# Altium PCB NB3000XN.PcbDoc (part 18 of 71)
Units mil, origin at the board's own origin, x right, y up, seen from the top; angles counter-clockwise.
Board outline 9527.56 x 6929.77 mil, 6 copper layers (Top Layer, GND+SHIELD, MidLayer1, MidLayer2, P2 - 3V3+5V0, Bottom Layer), stack 62.375 mil thick; 832 components, 1027 nets, 4655 pads, 4981 vias.
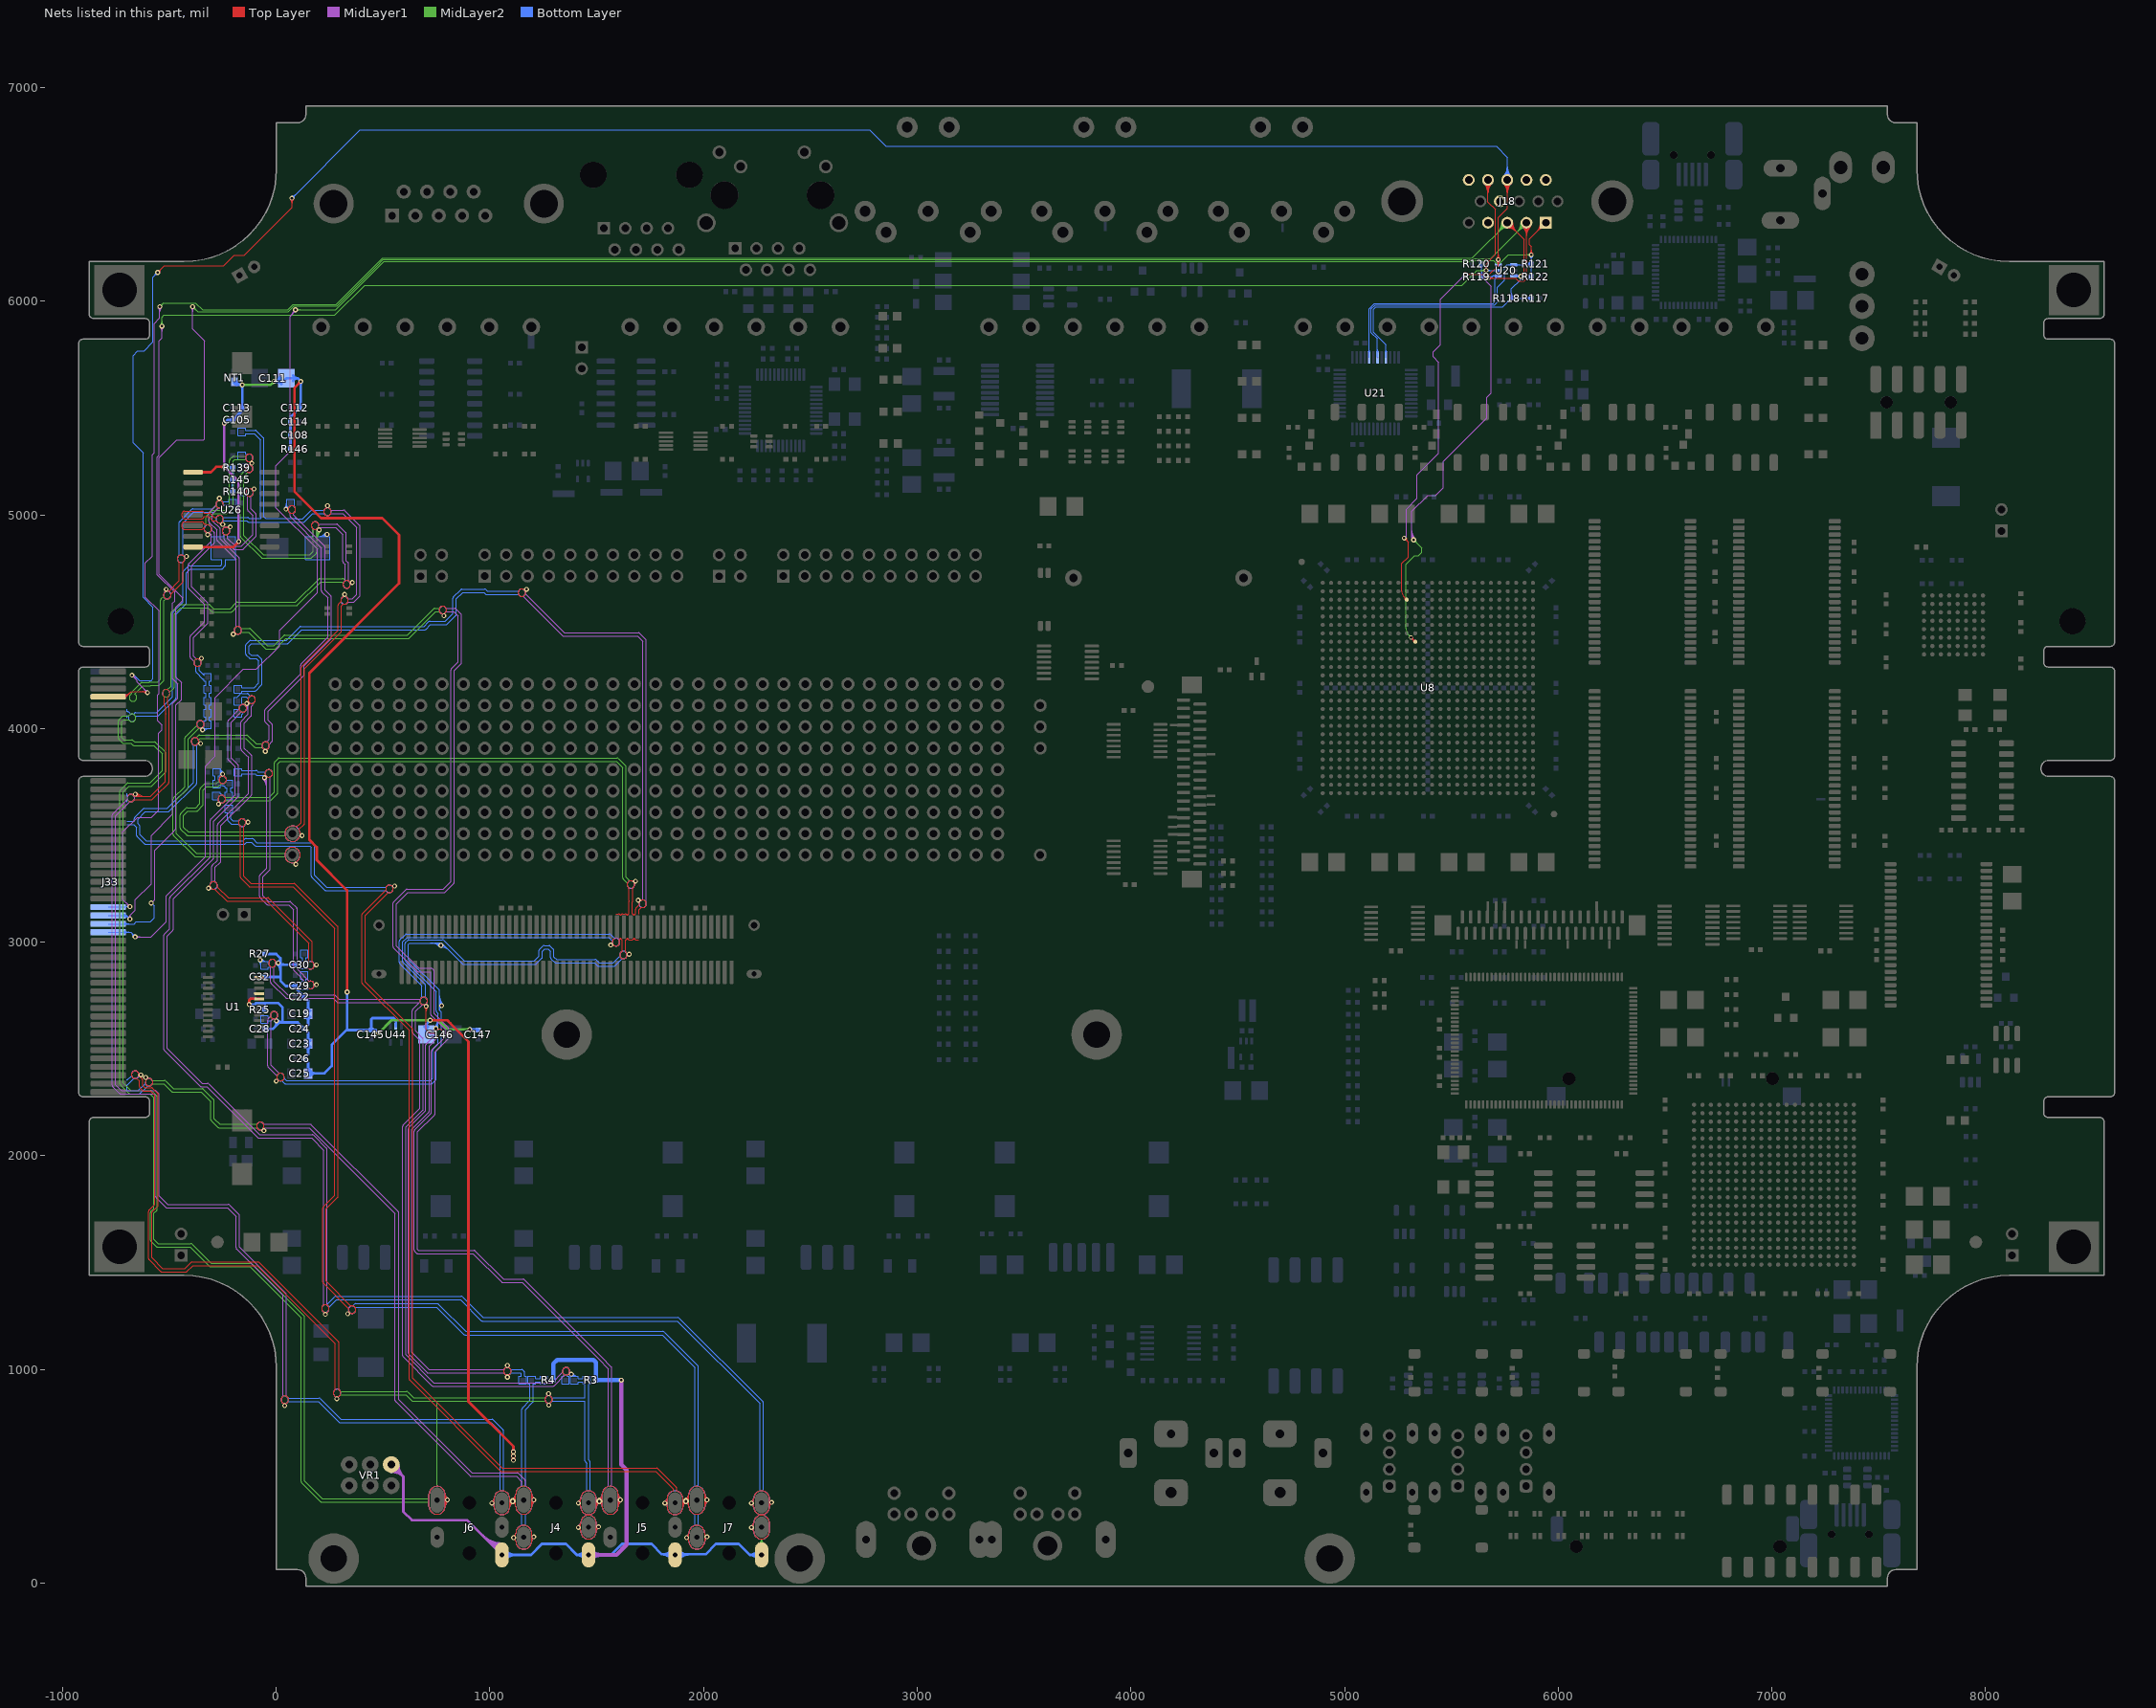
[diagram p22: the nets of this part, all layers, seen from the top]

## Via types
v1: diameter 23, hole 11.81, Top Layer to Bottom Layer, 3672 vias
v2: diameter 26, hole 11.81, Top Layer to Bottom Layer, 461 vias
v3: diameter 19, hole 11.81, Top Layer to Bottom Layer, tented both sides, 396 vias
v4: diameter 23.62, hole 11.81, Top Layer to Bottom Layer, 288 vias
v5: diameter 20, hole 11.81, Top Layer to Bottom Layer, 91 vias
v6: diameter 23, hole 11.81, Top Layer to Bottom Layer, tented both sides, 50 vias
v7: diameter 31, hole 11.81, Top Layer to Bottom Layer, 15 vias
v8: diameter 27.56, hole 11.81, Top Layer to Bottom Layer, tented both sides, 4 vias
v9: diameter 29, hole 11.81, Top Layer to Bottom Layer, 3 vias
v10: diameter 21, hole 11.81, Top Layer to Bottom Layer, 1 vias

## Nets (pads, with @x,y where several pads share a name; then routed paths per layer and width w, separated by ;. In a path a pad name is that pad's centre, name@x,y a point inside that pad or via, vN(x,y) a via of type N, cw(c..) or ccw(c..) an arc to the next point about the centre after c; other vN are vias at no path point) (continued)
ATE.VGA#.BLUE: J18.3 J33.B27 R117.1 R118.2 U20.3 U21.45 | length 12154.1
  Top Layer w4: J18.3@5761.68,6342.44 cw(c5761.68,6280.74) 5805.32,6324.37 cw(c5848.95,6368) J18.3@5787.24,6368 ; J18.3@5761.68,6346.44 cw(c5761.68,6294.39) 5798.49,6331.2 cw(c5835.29,6368) J18.3@5783.24,6368 ; J18.3@5761.68,6350.44 cw(c5761.68,6308.05) 5791.66,6338.02 cw(c5821.64,6368) J18.3@5779.24,6368 ; J18.3@5761.68,6354.44 cw(c5761.68,6321.71) 5784.83,6344.85 cw(c5807.98,6368) J18.3@5775.24,6368 ; J18.3@5761.68,6368 5840,6289.68 5840,6132.18 v1(5824.52,6116.71)
  MidLayer1 w4: v1@-694.31,3166.71 ccw(c-717.24,3166.71) -701.03,3182.93 ccw(c-684.81,3199.14) v1@-684.81,3176.21 ; v1@-690.31,3166.71 ccw(c-703.59,3166.71) -694.2,3176.1 ccw(c-684.81,3185.49) v1@-684.81,3172.21 ; v1(-684.81,3166.71) -718.14,3200.04 -718.14,3516.86 -650,3585 -583.94,3585 -551.48,3617.47 -551.48,3977.46 -534.5,3994.44 -534.5,4015.56 -555,4036.06 -555,4158.5 -549.19,4164.31 -549.19,4551.38 -612.81,4615 -612.81,4775 -580.14,4807.67 -580.14,5281.43 -571.52,5290.05 -571.52,5896.3 -545,5922.82 v4(-545,5975) ; v4@-551.94,5968.06 cw(c-568.69,5951.31) -545,5951.31 cw(c-521.31,5951.31) v4@-538.06,5968.06 ; v4@-549.11,5970.89 cw(c-559.03,5960.97) -545,5960.97 cw(c-530.97,5960.97) v4@-540.89,5970.89
  MidLayer2 w4: v4(-545,5975) -527.46,5992.54 -377.54,5992.54 -344.34,5959.34 53.28,5959.34 79.44,5985.5 280.5,5985.5 497.54,6202.54 5597.54,6202.54 5612.19,6217.19 5761.68,6366.68 J18.3@5761.68,6368 ; v4@-545,5980.81 ccw(c-545,5994.84) -535.08,5984.92 ccw(c-525.16,5975) v4@-539.19,5975 ; v4@-545,5984.81 ccw(c-545,6008.5) -528.25,5991.75 ccw(c-511.5,5975) v4@-535.19,5975 ; 5717.12,6322.12 ccw(c5671.25,6368) J18.3@5736.13,6368 ; 5720.3,6325.3 cw(c5761.68,6283.91) J18.3@5761.68,6342.44 ; 5723.95,6328.95 ccw(c5684.9,6368) J18.3@5740.13,6368 ; 5727.13,6332.13 cw(c5761.68,6297.57) J18.3@5761.68,6346.44 ; 5730.78,6335.78 ccw(c5698.56,6368) J18.3@5744.13,6368 ; 5733.95,6338.95 cw(c5761.68,6311.22) J18.3@5761.68,6350.44 ; 5737.61,6342.61 ccw(c5712.22,6368) J18.3@5748.13,6368 ; 5740.78,6345.78 cw(c5761.68,6324.88) J18.3@5761.68,6354.44
  Bottom Layer w4: J33.B27@-785.98,3164.67 -702.85,3164.67 -700.81,3166.71 ; v1@-693.15,3162.16 ccw(c-700.81,3157.98) -700.81,3166.71 ; v1@-693.15,3171.26 cw(c-700.81,3175.43) -700.81,3166.71 ; v1(-684.81,3166.71) -700.81,3166.71 ; U21.45@5191.38,5763.68 ccw(c5184.56,5770.51) 5194.21,5770.51 ccw(c5203.87,5770.51) U21.45@5197.04,5763.68 ; U21.45@5194.21,5737.32 5194.21,5795.79 5135,5855 5135,5962.37 5146.63,5974 5740.18,5974 R118.2@5781.18,6015 ; 5764.43,5998.25 cw(c5781.18,5981.5) R118.2@5781.18,6005.19 ; 5765.62,5999.44 ccw(c5750.55,6014.51) R118.2@5771.86,6014.51 ; R118.2@5771.26,6005.08 cw(c5781.18,5995.16) R118.2@5781.18,6009.19 ; R118.2@5772.45,6006.27 ccw(c5764.21,6014.51) R118.2@5775.86,6014.51 ; R118.2@5774.59,6022.08 ccw(c5758.68,6037.99) 5781.18,6037.99 ccw(c5803.68,6037.99) R118.2@5787.77,6022.08 ; R118.2@5777.42,6019.25 ccw(c5768.34,6028.33) 5781.18,6028.33 ccw(c5794.02,6028.33) R118.2@5784.94,6019.25 ; R118.2@5784.94,6011.24 cw(c5794.02,6002.16) 5794.02,6015 cw(c5794.02,6027.84) R118.2@5784.94,6018.76 ; R118.2@5787.77,6008.41 cw(c5803.68,5992.5) 5803.68,6015 cw(c5803.68,6037.5) R118.2@5787.77,6021.59 ; U20.3@5792.17,6118.82 v1@5815.19,6118.82 ; U20.3@5796.49,6118.82 cw(c5796.49,6088.68) v1@5817.81,6109.99 ; U20.3@5805.18,6114.67 cw(c5815.19,6104.68) v1@5815.19,6118.82 ; U20.3@5805.18,6122.97 ccw(c5815.19,6132.96) v1@5815.19,6118.82 ; U20.3@5806.15,6118.82 cw(c5806.15,6098.33) v1@5820.64,6112.82 ; U20.3@5806.69,6118.82 ccw(c5806.69,6134.55) v1@5817.81,6123.43 ; v1@5815.19,6118.71 5817.19,6116.71 v1(5824.52,6116.71) 5824.52,6101.71 5781.18,6058.36 R118.2@5781.18,6015 ; R117.1@5867.23,6008.41 ccw(c5851.32,5992.5) 5851.32,6015 ccw(c5851.32,6037.5) R117.1@5867.23,6021.59 ; R117.1@5870.06,6011.24 ccw(c5860.98,6002.16) 5860.98,6015 ccw(c5860.98,6027.84) R117.1@5870.06,6018.76 ; R117.1@5873.82,6015 R118.2@5781.18,6015
ATE.VGA#.GREEN: J18.2 J33.B29 R119.1 R120.2 U20.4 U21.41 | length 12545.8
  Top Layer w4: v1(5672.52,6108.37) 5801.63,6108.37 5815,6095 5840,6095 5851.84,6106.84 J18.2@5851.84,6368 ; v1@5676.41,6104.49 cw(c5685.8,6095.1) 5685.8,6108.37 cw(c5685.8,6121.65) v1@5676.41,6112.26 ; v1@5679.24,6101.66 cw(c5695.46,6085.44) 5695.46,6108.37 cw(c5695.46,6131.31) v1@5679.24,6115.09 ; J18.2@5833.77,6349.93 cw(c5790.14,6306.3) 5851.84,6306.3 cw(c5913.55,6306.3) J18.2@5869.92,6349.93 ; J18.2@5836.6,6352.76 cw(c5799.79,6315.95) 5851.84,6315.95 cw(c5903.89,6315.95) J18.2@5867.09,6352.76 ; J18.2@5839.43,6355.58 cw(c5809.45,6325.61) 5851.84,6325.61 cw(c5894.23,6325.61) J18.2@5864.26,6355.58 ; J18.2@5842.25,6358.41 cw(c5819.11,6335.27) 5851.84,6335.27 cw(c5884.58,6335.27) J18.2@5861.43,6358.41
  MidLayer1 w4: v1(-584.81,3183.37) -569,3199.18 -569,3217.77 -568.98,3429.56 -487.44,3511.1 -468.81,3529.73 -468.81,4109.94 -444,4134.75 -444,4170 -444,4215.25 -468.81,4240.06 -468.81,4566.44 -437.5,4597.75 -437.5,4612.25 -548.14,4722.89 -548.14,5268.17 -464.75,5351.56 -339.03,5351.56 -335.52,5355.08 -335.52,5815.05 -391.48,5871.01 v1(-391.48,5975.04) ; v1@-398.19,5968.32 cw(c-414.41,5952.11) -391.48,5952.11 cw(c-368.54,5952.11) v1@-384.76,5968.32 ; v1@-395.36,5971.15 cw(c-404.75,5961.76) -391.48,5961.76 cw(c-378.2,5961.76) v1@-387.59,5971.15
  MidLayer2 w4: v1@-391.48,5965.54 cw(c-391.48,5942.61) -375.26,5958.82 cw(c-359.04,5975.04) v1@-381.98,5975.04 ; v1@-391.48,5969.54 cw(c-391.48,5956.26) -382.09,5965.65 cw(c-372.7,5975.04) v1@-385.98,5975.04 ; v1(-391.48,5975.04) -367.77,5951.34 56.59,5951.34 82.75,5977.5 283.81,5977.5 472.5,6166.19 500.85,6194.54 5600.85,6194.54 5606.35,6200.04 5683.88,6200.04 J18.2@5851.84,6368 ; J18.2@5826.28,6368 cw(c5764.58,6368) 5808.21,6324.37 cw(c5851.84,6280.74) J18.2@5851.84,6342.44 ; J18.2@5830.28,6368 cw(c5778.23,6368) 5815.04,6331.19 cw(c5851.84,6294.4) J18.2@5851.84,6346.44 ; J18.2@5834.28,6368 cw(c5791.89,6368) 5821.87,6338.02 cw(c5851.84,6308.05) J18.2@5851.84,6350.44 ; J18.2@5838.28,6368 cw(c5805.55,6368) 5828.7,6344.85 cw(c5851.84,6321.71) J18.2@5851.84,6354.44
  Bottom Layer w4: J33.B29@-785.98,3085.93 -663.92,3085.93 -654.72,3095.13 -589.54,3095.13 -570.41,3114.27 -570.41,3168.97 v1(-584.81,3183.37) ; J33.B29@-711.58,3080.43 cw(c-698.3,3067.15) -698.3,3085.93 cw(c-698.3,3104.71) J33.B29@-711.58,3091.43 ; J33.B29@-708.76,3077.6 cw(c-688.65,3057.49) -688.65,3085.93 cw(c-688.65,3114.37) J33.B29@-708.76,3094.26 ; U21.41@5112.64,5763.68 ccw(c5105.82,5770.51) 5115.47,5770.51 ccw(c5125.13,5770.51) U21.41@5118.3,5763.68 ; U21.41@5115.47,5737.32 5115.47,5965.47 5140,5990 5695,5990 5705,6000 5705,6104.49 U20.4@5719.33,6118.82 5718.15,6120 5695,6120 ; R119.1@5634.59,6122.08 ccw(c5618.68,6137.99) 5641.18,6137.99 ccw(c5663.68,6137.99) R119.1@5647.77,6122.08 ; R120.2@5634.59,6167.92 cw(c5618.68,6152.01) 5641.18,6152.01 cw(c5663.68,6152.01) R120.2@5647.77,6167.92 ; R119.1@5637.42,6119.25 ccw(c5628.34,6128.33) 5641.18,6128.33 ccw(c5654.02,6128.33) R119.1@5644.94,6119.25 ; R120.2@5637.42,6170.75 cw(c5628.34,6161.67) 5641.18,6161.67 cw(c5654.02,6161.67) R120.2@5644.94,6170.75 ; R120.2@5641.18,6175 R119.1@5641.18,6115 5647.81,6108.37 v1(5672.52,6108.37) ; R119.1@5642.23,6115.31 ccw(c5656.3,6126.11) 5656.3,6108.37 ; R119.1@5645.4,6117.75 ccw(c5664.41,6132.34) v1@5664.41,6108.37 ; R119.1@5648.57,6120.18 ccw(c5672.52,6138.57) v1(5672.52,6108.37) ; v1@5665.81,6101.66 ccw(c5649.59,6085.44) 5649.59,6108.37 ccw(c5649.59,6131.31) v1@5665.81,6115.09 ; v1@5668.64,6104.49 ccw(c5659.25,6095.1) 5659.25,6108.37 ccw(c5659.25,6121.65) v1@5668.64,6112.26 ; v1@5673.18,6109.72 ccw(c5678.48,6120.63) 5687.06,6112.06 ; v1@5674.93,6113.32 ccw(c5681.08,6125.98) 5691.03,6116.03 ; v1@5676.68,6116.92 ccw(c5683.68,6131.32) 5695,6120 ; 5699.14,6120 ccw(c5699.14,6130.15) U20.4@5706.32,6122.97 ; U20.4@5706.04,6114.97 ccw(c5695,6105.38) 5695,6120 ; v1(5672.52,6108.37) 5683.37,6108.37 5695,6120
ATE.VGA#.HSYNC: J18.13 J33.A4 U8.C11 U20.6 | length 13202.8
  Top Layer w4: J33.A4@-785.98,4148.92 -702.59,4148.92 ; J33.A4@-717.72,4144.75 ccw(c-714.86,4163.57) -701.41,4150.11 ; J33.A4@-717.12,4148.71 ccw(c-713.39,4173.29) -695.81,4155.71 ; J33.A4@-716.52,4152.66 ccw(c-711.92,4183.01) -690.21,4161.3 ; J33.A4@-715.92,4156.62 ccw(c-710.44,4192.73) -684.62,4166.9 ; J33.A4@-715.32,4160.57 ccw(c-708.97,4202.45) -679.02,4172.5 ; J33.A4@-705.55,4146.52 cw(c-702.59,4145.9) -702.59,4148.92 ; J33.A4@-705.55,4151.33 ccw(c-702.59,4151.95) -702.59,4148.92 ; -635.21,4172.5 cw(c-635.21,4135.48) v1@-609.03,4161.66 ; -625.55,4172.5 cw(c-625.55,4145.14) v1@-606.2,4164.49 ; -615.89,4172.5 cw(c-615.89,4154.79) v1@-603.37,4167.31 ; -615.29,4172.5 ccw(c-615.29,4181.35) v1@-609.03,4175.09 ; v1(-602.31,4168.37) -601.48,4168.37 -605.6,4172.5 -679.02,4172.5 -702.59,4148.92 ; v1(-555,6135) -523.29,6166.71 -245.92,6166.71 -197.15,6215.48 -149.52,6215.48 73.52,6438.52 v1(73.52,6482.71) ; v1@-555,6140.5 ccw(c-555,6153.78) -545.61,6144.39 ccw(c-536.22,6135) v1@-549.5,6135 ; v1@-555,6144.5 ccw(c-555,6167.43) -538.78,6151.22 ccw(c-522.57,6135) v1@-545.5,6135 ; v1@66.81,6475.99 cw(c50.59,6459.77) 73.52,6459.77 cw(c96.46,6459.77) v1@80.24,6475.99 ; v1@69.64,6478.82 cw(c60.25,6469.43) 73.52,6469.43 cw(c86.8,6469.43) v1@77.41,6478.82 ; v1@5279.52,4881.87 cw(c5279.52,4858.94) 5295.74,4875.16 cw(c5311.96,4891.37) v1@5289.02,4891.37 ; v1@5279.52,4885.87 cw(c5279.52,4872.6) 5288.91,4881.99 cw(c5298.3,4891.37) v1@5285.02,4891.37 ; v1(5279.52,4891.37) 5298.02,4872.87 5298.02,4803.13 5267.71,4772.82 ; U8.C11@5284.23,4603.39 ccw(c5266.51,4603.39) 5279.04,4615.92 ; U8.C11@5291.57,4610.73 cw(c5291.57,4628.45) 5279.04,4615.92 ; v1(5565.52,6126.37) 5678.52,6126.37 5719.19,6167.04 v1(5719.19,6195.04) ; v1@5569.41,6122.49 cw(c5578.8,6113.1) 5578.8,6126.37 cw(c5578.8,6139.65) v1@5569.41,6130.26 ; v1@5572.24,6119.66 cw(c5588.46,6103.44) 5588.46,6126.37 cw(c5588.46,6149.31) v1@5572.24,6133.09 ; v1@5712.47,6188.32 cw(c5696.26,6172.11) 5719.19,6172.11 cw(c5742.13,6172.11) v1@5725.91,6188.32 ; v1@5712.47,6201.76 ccw(c5696.26,6217.98) 5719.19,6217.98 ccw(c5742.13,6217.98) v1@5725.91,6201.76 ; v1@5715.3,6191.15 cw(c5705.91,6181.76) 5719.19,6181.76 cw(c5732.47,6181.76) v1@5723.08,6191.15 ; v1@5715.3,6198.93 ccw(c5705.91,6208.32) 5719.19,6208.32 ccw(c5732.47,6208.32) v1@5723.08,6198.93 ; v1@5723.52,6199.37 v1(5719.19,6195.04) ; J18.13@5743.61,6549.93 cw(c5699.98,6506.29) 5761.69,6506.29 cw(c5823.39,6506.3) J18.13@5779.76,6549.93 ; J18.13@5746.44,6552.76 cw(c5709.64,6515.95) 5761.69,6515.95 cw(c5813.73,6515.95) J18.13@5776.93,6552.76 ; J18.13@5749.27,6555.58 cw(c5719.29,6525.61) 5761.69,6525.61 cw(c5804.08,6525.61) J18.13@5774.1,6555.58 ; J18.13@5752.1,6558.41 cw(c5728.95,6535.27) 5761.69,6535.27 cw(c5794.42,6535.27) J18.13@5771.27,6558.41 ; J18.13@5761.68,6568 5761.69,6435 5719.19,6392.5 v1(5719.19,6195.04) ; 5267.71,4720 5267.71,4724.74 5267.71,4772.82 ; 5267.71,4720 5267.71,4772.81 ; 5267.71,4720 5267.71,4710 5267.71,4643.27 ccw(c5306.39,4643.27) 5279.04,4615.92
  MidLayer1 w4: v1@-675,4240.5 cw(c-675,4217.56) -658.78,4233.78 cw(c-642.57,4250) v1@-665.5,4250 ; v1@-675,4244.5 cw(c-675,4231.22) -665.61,4240.61 cw(c-656.22,4250) v1@-669.5,4250 ; v1(-675,4250) -650.69,4225.69 -650.69,4217.59 v1@-602.31,4169.21 ; -619.12,4186.02 cw(c-636.76,4168.37) v1@-611.81,4168.37 ; -617.1,4184 ccw(c-602.31,4198.79) v1@-602.31,4177.87 ; -612.29,4179.19 cw(c-623.11,4168.37) v1@-607.81,4168.37 ; -610.27,4177.17 ccw(c-602.31,4185.14) v1@-602.31,4173.87 ; v1(5279.52,4891.37) 5289.52,4901.37 5289.52,5027 5340.19,5077.67 5340.19,5188.73 5440.19,5288.73 5440.19,5582.37 5440.19,5715 5415.19,5740 5415.19,5764.04 5448.52,5797.37 5448.52,6009.37 v1(5565.52,6126.37) ; v1@5556.02,6126.37 cw(c5533.09,6126.37) 5549.31,6110.16 cw(c5565.52,6093.94) v1@5565.52,6116.87 ; v1@5560.02,6126.37 cw(c5546.75,6126.37) 5556.14,6116.99 cw(c5565.52,6107.6) v1@5565.52,6120.87 ; v1@-602.31,4169.21 v1(-602.31,4168.37) -601.48,4168.37 v1@-602.31,4169.21
  Bottom Layer w4: v1@-675,4240.5 cw(c-675,4193.67) -641.88,4226.78 ; v1@-675,4244.5 cw(c-675,4207.32) -648.71,4233.61 ; v1@-675,4248.5 cw(c-675,4220.98) -655.54,4240.44 ; v1(-675,4250) -665.1,4250 -640.1,4225 -585,4225 -576.48,4233.52 -576.48,4567.02 -623,4613.54 -623,5291.69 -670,5338.69 -670,5746.12 -648.12,5768 -618.31,5768 -576.48,5809.84 -576.48,6113.52 v1(-555,6135) ; v1@-675,4252.5 cw(c-675,4234.64) -662.37,4247.27 ; v1@-564.5,6135 cw(c-587.44,6135) -571.22,6118.78 cw(c-555,6102.56) v1@-555,6125.5 ; v1@-560.5,6135 cw(c-573.78,6135) -564.39,6125.61 cw(c-555,6116.22) v1@-555,6129.5 ; v1(73.52,6482.71) 392.82,6802 2776.69,6802 2853.65,6725.04 5709.96,6725.04 5761.68,6673.31 J18.13@5761.68,6568 ; v1@73.52,6488.21 ccw(c73.52,6501.49) 82.91,6492.1 ccw(c92.3,6482.71) v1@79.02,6482.71 ; v1@73.52,6492.21 ccw(c73.52,6515.14) 89.74,6498.93 ccw(c105.96,6482.71) v1@83.02,6482.71 ; v1@5712.47,6188.32 cw(c5695.91,6171.76) U20.6@5719.33,6171.76 ; U20.6@5715.18,6174.15 ccw(c5705.15,6184.18) 5719.33,6184.18 ccw(c5733.51,6184.18) U20.6@5723.49,6174.15 ; v1@5715.3,6191.15 cw(c5705.57,6181.42) 5719.33,6181.42 ; v1(5719.19,6195.04) 5719.33,6194.9 U20.6@5719.33,6170 ; U20.6@5719.33,6172.45 cw(c5741.78,6172.45) v1@5725.91,6188.32 ; 5719.33,6182.11 cw(c5732.12,6182.11) v1@5723.08,6191.15 ; J18.13@5743.61,6586.07 ccw(c5699.98,6629.7) 5761.69,6629.7 ccw(c5823.39,6629.7) J18.13@5779.76,6586.07 ; J18.13@5746.44,6583.24 ccw(c5709.64,6620.05) 5761.68,6620.05 ccw(c5813.73,6620.05) J18.13@5776.93,6583.24 ; J18.13@5749.27,6580.42 ccw(c5719.29,6610.39) 5761.68,6610.39 ccw(c5804.08,6610.39) J18.13@5774.1,6580.42 ; J18.13@5752.1,6577.59 ccw(c5728.95,6600.73) 5761.68,6600.73 ccw(c5794.42,6600.73) J18.13@5771.27,6577.59
ATE.VGA#.ID0: J18.11
ATE.VGA#.ID1/SDA/DDC: J18.12
ATE.VGA#.ID2: J18.4
ATE.VGA#.ID3/SCL/DDC: J18.15
ATE.VGA#.KEY: J18.9
ATE.VGA#.RED: J18.1 J33.B30 R121.2 R122.2 U20.1 U21.43 | length 12038.7
  Top Layer w4: v1@5867.14,6223.76 ccw(c5850.92,6239.98) 5873.86,6239.98 ccw(c5896.79,6239.98) v1@5880.57,6223.76 ; v1@5869.97,6220.93 ccw(c5860.58,6230.32) 5873.86,6230.32 ccw(c5887.14,6230.32) v1@5877.75,6220.93 ; v1(5873.86,6217.04) 5873.86,6256.14 5865,6265 5865,6291 J18.1@5942,6368 ; J18.1@5916.44,6368 cw(c5854.74,6368) 5898.37,6324.37 cw(c5942,6280.74) J18.1@5942,6342.44 ; J18.1@5920.44,6368 cw(c5868.39,6368) 5905.2,6331.2 cw(c5942,6294.39) J18.1@5942,6346.44 ; J18.1@5924.44,6368 cw(c5882.05,6368) 5912.02,6338.02 cw(c5942,6308.05) J18.1@5942,6350.44 ; J18.1@5928.44,6368 cw(c5895.71,6368) 5918.85,6344.85 cw(c5942,6321.71) J18.1@5942,6354.44
  MidLayer1 w4: v1(-659.81,3025.04) -586.02,3025.04 -521,3090.06 -521,3090.31 -515.5,3095.81 -515.5,3216.82 -332,3400.32 -332,3823.31 -285.23,3870.09 -285.23,4006.77 -287,4008.55 -287,4144.87 -153.87,4278 -93.16,4278 15.19,4386.35 15.19,4460.19 192,4637 192,4840.65 -1.48,5034.13 -1.48,5230.39 65.19,5297.06 65.19,5930 v1@92.6,5957.4 ; v1@-655.92,3021.15 cw(c-646.53,3011.76) -646.53,3025.04 cw(c-646.53,3038.32) v1@-655.92,3028.93 ; v1@-653.09,3018.32 cw(c-636.87,3002.11) -636.87,3025.04 cw(c-636.87,3047.98) v1@-653.09,3031.76 ; 70.11,5934.92 ccw(c45.03,5960) v1@80.5,5960 ; 76.94,5941.75 ccw(c58.69,5960) v1@84.5,5960 ; 82.64,5947.45 cw(c90,5940.1) v1@90,5950.5 ; 83.77,5948.58 ccw(c72.35,5960) v1@88.5,5960
  MidLayer2 w4: v1(90,5960) 277.63,5960 504.17,6186.54 5604.17,6186.54 5609.34,6191.71 5697.77,6191.71 5711.94,6177.54 5726.44,6177.54 5765.94,6217.04 v1(5873.86,6217.04) ; v1@93.89,5956.11 cw(c103.28,5946.72) 103.28,5960 cw(c103.28,5973.28) v1@93.89,5963.89 ; v1@96.72,5953.28 cw(c112.93,5937.06) 112.93,5960 cw(c112.93,5982.93) v1@96.72,5966.72 ; v1@5867.14,6210.32 ccw(c5850.92,6194.11) 5850.92,6217.04 ccw(c5850.92,6239.98) v1@5867.14,6223.76 ; v1@5869.97,6213.15 ccw(c5860.58,6203.76) 5860.58,6217.04 ccw(c5860.58,6230.32) v1@5869.97,6220.93
  Bottom Layer w4: J33.B30@-785.98,3046.56 -681.33,3046.56 v1(-659.81,3025.04) ; J33.B30@-711.58,3041.06 cw(c-698.3,3027.78) -698.3,3046.56 cw(c-698.3,3065.34) J33.B30@-711.58,3052.06 ; J33.B30@-708.76,3038.23 cw(c-688.65,3018.12) -688.65,3046.56 cw(c-688.65,3075) J33.B30@-708.76,3054.89 ; v1@-669.31,3025.04 ccw(c-692.24,3025.04) -676.03,3041.26 ccw(c-659.81,3057.48) v1@-659.81,3034.54 ; v1@-665.31,3025.04 ccw(c-678.59,3025.04) -669.2,3034.43 ccw(c-659.81,3043.82) v1@-659.81,3030.54 ; 5152.89,5775.23 ccw(c5169.22,5775.23) U21.43@5157.67,5763.68 ; U21.43@5154.84,5737.32 5152.89,5739.28 5152.89,5825 5125,5852.89 5125,5963.69 5143.31,5982 5702,5982 5715,5995 5715,6065 5750,6100 5750,6160 5760,6170 U20.1@5792.17,6170 5868.82,6170 R121.2@5873.82,6175 ; U20.1@5779.16,6165.85 ccw(c5769.13,6155.82) 5769.13,6170 ccw(c5769.13,6184.18) U20.1@5779.16,6174.15 ; U20.1@5805.18,6165.85 cw(c5815.21,6155.82) 5815.21,6170 cw(c5815.21,6184.18) U20.1@5805.18,6174.15 ; 5840.44,6170 ccw(c5840.44,6207.89) R121.2@5867.23,6181.1 ; 5850.09,6170 ccw(c5850.09,6198.23) R121.2@5870.06,6178.27 ; 5859.75,6170 ccw(c5859.75,6188.57) R121.2@5872.89,6175.44 ; 5862.2,6170 cw(c5862.2,6162.89) 5867.23,6167.92 cw(c5851.32,6152.01) 5873.82,6152.01 cw(c5896.32,6152.01) R121.2@5880.41,6167.92 ; v1@5867.14,6210.32 cw(c5850.92,6194.11) 5873.86,6194.11 cw(c5896.79,6194.11) v1@5880.57,6210.32 ; R122.2@5867.23,6122.08 ccw(c5851.32,6137.99) 5873.82,6137.99 ccw(c5896.32,6137.99) R122.2@5880.41,6122.08 ; R121.2@5867.23,6182.08 ccw(c5851.23,6198.08) 5873.86,6198.08 ; v1@5869.97,6213.15 cw(c5860.58,6203.76) 5873.86,6203.76 cw(c5887.14,6203.76) v1@5877.75,6213.15 ; R122.2@5870.06,6119.25 ccw(c5860.98,6128.33) 5873.82,6128.33 ccw(c5886.66,6128.33) R122.2@5877.58,6119.25 ; R121.2@5870.06,6170.75 cw(c5860.98,6161.67) 5873.82,6161.67 cw(c5886.66,6161.67) R121.2@5877.58,6170.75 ; R121.2@5870.06,6179.25 ccw(c5860.89,6188.43) 5873.86,6188.43 ; R122.2@5873.82,6115 R121.2@5873.82,6175 ; 5873.86,6188.24 ccw(c5886.57,6188.24) R121.2@5877.58,6179.25 ; 5873.86,6197.9 ccw(c5896.22,6197.9) R121.2@5880.41,6182.08 ; v1(5873.86,6217.04) 5873.86,6175.04 R121.2@5873.82,6175
ATE.VGA#.VSYNC: J18.14 J33.B28 U8.H12 U20.5 | length 13007.6
  Top Layer w4: v3(5311.26,4426.22) U8.H12@5330.94,4406.54 ; U8.H12@5323.44,4406.54 ccw(c5305.34,4406.54) 5318.14,4419.34 ccw(c5330.94,4432.14) U8.H12@5330.94,4414.04 ; U8.H12@5323.6,4406.54 ccw(c5305.88,4406.54) 5318.41,4419.07 ccw(c5330.94,4431.6) U8.H12@5330.94,4413.88 ; J18.14@5653.45,6549.93 cw(c5609.82,6506.29) 5671.53,6506.29 cw(c5733.23,6506.3) J18.14@5689.6,6549.93 ; v1@5656.14,6151.43 ccw(c5639.92,6167.64) 5662.86,6167.64 ccw(c5685.79,6167.64) v1@5669.57,6151.43 ; J18.14@5656.28,6552.76 cw(c5619.48,6515.95) 5671.53,6515.95 cw(c5723.57,6515.95) J18.14@5686.77,6552.76 ; v1@5658.97,6148.6 ccw(c5649.58,6157.99) 5662.86,6157.99 ccw(c5676.14,6157.99) v1@5666.75,6148.6 ; J18.14@5659.11,6555.58 cw(c5629.13,6525.61) 5671.53,6525.61 cw(c5713.92,6525.61) J18.14@5683.94,6555.58 ; J18.14@5661.94,6558.41 cw(c5638.79,6535.26) 5671.53,6535.26 cw(c5704.26,6535.27) J18.14@5681.12,6558.41 ; v1(5662.86,6144.71) 5662.86,6175 5706.86,6219 5706.86,6429.71 5671.53,6465.04 J18.14@5671.53,6568 ; 5324.06,4413.42 cw(c5336.87,4426.22) 5318.76,4426.22 ccw(c5336.87,4426.22) 5324.06,4413.42 ; 5324.06,4413.42 ccw(c5311.26,4400.61) 5311.26,4418.72 cw(c5311.26,4400.61) 5324.06,4413.42
  MidLayer1 w4: v1@-689.65,3116.55 ccw(c-694.68,3125.04) -684.81,3125.04 ; v1(-684.81,3108.37) -684.81,3125.04 ; v1@-679.97,3116.55 cw(c-674.94,3125.04) -684.81,3125.04 ; v1@-541.53,5876.66 cw(c-557.74,5860.44) -534.81,5860.44 cw(c-511.87,5860.44) v1@-528.09,5876.66 ; v1@-538.7,5879.49 cw(c-548.09,5870.1) -534.81,5870.1 cw(c-521.53,5870.1) v1@-530.92,5879.49 ; v1(-534.81,5883.37) -534.81,5827.75 -544,5818.56 -547.52,5815.05 -547.52,5280.11 -556.14,5271.48 -556.14,4719.58 -475,4638.43 -475,4596.31 -484.81,4586.5 -484.81,4233.43 -460,4208.62 -460,4141.38 -484.81,4116.57 -484.81,3600.04 -585,3499.85 -585,3272.79 -659.81,3197.98 -659.81,3150.04 -684.81,3125.04 ; 5315.19,4897.46 ccw(c5337.61,4897.46) v1@5321.76,4881.61 ; 5315.19,4907.12 ccw(c5347.27,4907.12) v1@5324.58,4884.44 ; 5315.19,4916.77 ccw(c5356.92,4916.77) v1@5327.41,4887.26 ; 5315.19,4926.43 ccw(c5366.58,4926.43) v1@5330.24,4890.09 ; v1(5323.52,4883.37) 5315.19,4891.71 5315.19,5016.71 5390.19,5091.71 5426.71,5091.71 5462.5,5127.5 5462.5,5250.33 5666.19,5454.02 5666.19,5551.45 5686,5571.26 5686,6069 5650,6105 5650,6131.85 v1(5662.86,6144.71)
  MidLayer2 w4: v1@-541.53,5890.09 ccw(c-557.74,5906.31) -534.81,5906.31 ccw(c-511.87,5906.31) v1@-528.09,5890.09 ; v1@-538.7,5887.26 ccw(c-548.09,5896.65) -534.81,5896.65 ccw(c-521.53,5896.65) v1@-530.92,5887.26 ; v1(-534.81,5883.37) -534.81,5925.19 -524.66,5935.34 78.6,5935.34 79.44,5934.5 274.76,5934.5 415.3,6075.04 5550,6075.04 5619.67,6144.71 v1(5662.86,6144.71) ; 5287.4,4699.16 5287.4,4640.9 ; v3@5303.79,4426.87 ccw(c5285.75,4428.45) 5299.62,4440.09 ; v3@5311.91,4433.69 cw(c5313.49,4451.73) 5299.62,4440.09 ; v1@5323.52,4873.87 cw(c5323.52,4850.94) 5339.74,4867.16 cw(c5355.96,4883.37) v1@5333.02,4883.37 ; v1@5323.52,4877.87 cw(c5323.52,4864.6) 5332.91,4873.99 cw(c5342.3,4883.37) v1@5329.02,4883.37 ; v1(5323.52,4883.37) 5362.52,4844.37 5362.52,4827.52 5362.5,4825 5347.07,4809.56 5327.03,4809.56 5287.4,4769.93 5287.4,4720 5287.4,4710 5287.4,4640.9 ; v1@5656.14,6137.99 ccw(c5639.92,6121.77) 5639.92,6144.71 ccw(c5639.92,6167.64) v1@5656.14,6151.43 ; v1@5658.97,6140.82 ccw(c5649.58,6131.43) 5649.58,6144.71 ccw(c5649.58,6157.99) v1@5658.97,6148.6 ; 5287.4,4640.9 5287.4,4582.64 5287.4,4563.22 5287.4,4489.1 5287.4,4469.6 ccw(c5329.13,4469.6) 5299.62,4440.09
  Bottom Layer w4: J33.B28@-785.98,3125.3 -701.74,3125.3 ; J33.B28@-717.65,3129.48 cw(c-714.82,3108.65) -699.95,3123.52 ; J33.B28@-717.11,3125.52 cw(c-713.45,3098.61) -694.25,3117.81 ; J33.B28@-716.57,3121.56 cw(c-712.09,3088.57) v1@-688.55,3112.11 ; J33.B28@-716.04,3117.59 cw(c-710.72,3078.53) v1@-682.84,3106.41 ; J33.B28@-705.71,3122.26 cw(c-701.74,3121.19) -701.74,3125.3 ; J33.B28@-705.71,3128.35 ccw(c-701.74,3129.41) -701.74,3125.3 ; v1@-694.31,3108.37 ccw(c-717.24,3108.37) -701.03,3124.59 ccw(c-684.81,3140.81) v1@-684.81,3117.87 ; v1@-690.31,3108.37 ccw(c-703.59,3108.37) -694.2,3117.76 ccw(c-684.81,3127.15) v1@-684.81,3113.87 ; v1(-684.81,3108.37) -701.74,3125.3 ; v1(5662.86,6144.71) 5678.86,6144.71 ; v1@5671.2,6140.16 cw(c5678.86,6135.98) 5678.86,6144.71 ; v1@5671.2,6149.26 ccw(c5678.86,6153.43) 5678.86,6144.71 ; U20.5@5706.32,6140.26 ccw(c5696.29,6130.23) 5696.29,6144.41 ccw(c5696.29,6158.59) U20.5@5706.32,6148.56 ; U20.5@5719.33,6144.41 5679.16,6144.41 5678.86,6144.71
AUDIO_CODEC.MUTEA: U1.21
AUDIO_CODEC.MUTEB: U1.24
AUGND: C19.2 C22.2 C23.2 C24.1 C25.2 C26.2 C28.2 C29.2 C30.2 C32.2 C105.1 C108.2 C111.2 C112.1 C113.1 C114.1 C145.1 C146.2 C147.1 J4.1 J5.1 J6.1 J7.1 NT1.1 R3.1 R4.1 R25.1 R27.1 R139.1 R140.1 R145.1 R146.2 U1.20 U26.1 U26.8 U44.2 VR1.1 | length 223427.7
  Top Layer w4: -692.37,3662.63 ccw(c-680,3675) -664.44,3667 -584.81,3667 ; -692.37,3687.37 cw(c-680,3675) -664.44,3683 -588.12,3683 -566.63,3704.49 ; v1@-664.1,3688.4 ccw(c-651.05,3701.45) -651.05,3683 ; v1@-661.27,3691.23 ccw(c-641.39,3711.11) -641.39,3683 ; v1@-658.44,3694.06 ccw(c-631.74,3720.76) -631.74,3683 ; v1@-655.61,3696.89 ccw(c-622.08,3730.42) -622.08,3683 ; v1@-652.78,3699.72 ccw(c-612.42,3740.08) -612.42,3683 ; -570.04,3701.09 -566.63,3704.5 ; -555.32,3693.18 -558.73,3689.77 ; -518,3795 -518,3753.12 -566.63,3704.5 ; -517.81,3796.73 -517.81,4068.27 cw(c-510,4070) -517.81,4071.73 -517.81,4101.69 -520.66,4104.53 ; -502,3793.27 -502,3749.81 ; -501.81,3795 -501.81,4070.19 -501.81,4105 ; -338.09,4941.77 cw(c-349.76,4944.09) -349.76,4932.19 -428.5,4932.19 cw(c-428.5,4944.09) -440.41,4944.09 -440.41,4955.91 cw(c-428.5,4955.91) -428.5,4967.81 -349.76,4967.81 cw(c-349.76,4955.91) -338.04,4958 -335,4958 ; -336.66,4940.35 ccw(c-320,4935) -302.5,4935 ccw(c-320,4935) -325.35,4951.66 -329.34,4955.66 ; v1@695.28,2693.28 cw(c679.06,2677.06) 702,2677.06 cw(c724.93,2677.06) v1@708.72,2693.28 ; v1@698.11,2696.11 cw(c688.72,2686.72) 702,2686.72 cw(c715.28,2686.72) v1@705.89,2696.11 ; v1(702,2700) 702,2593 720,2575 745,2575 ; 790.92,358.84 cw(c815.82,358.84) v1@804.98,381.26 ; 790.92,365.22 cw(c812.74,365.22) v1@803.24,384.86 ; 790.92,371.59 cw(c809.66,371.59) v1@801.5,388.46 ; 790.92,377.97 cw(c806.58,377.97) v1@799.76,392.06 ; 790.92,399.67 ccw(c803.67,399.67) v1@800.16,387.41 ; 790.92,404.98 ccw(c805.2,404.98) v1@801.26,391.25 ; 790.92,410.28 ccw(c806.72,410.28) v1@802.37,395.1 ; v1@803.47,398.94 cw(c808.24,415.59) 790.92,415.59 ; v1@1009.14,375.94 ccw(c1009.11,385.91) 1019.08,385.91 ; v1@1009.13,379.94 ccw(c1009.1,389.92) 1019.08,389.92 ; v1@1009.12,383.94 ccw(c1009.08,393.94) 1019.08,393.94 ; v1@1009.16,371.94 ccw(c1009.12,381.9) 1019.08,381.9 ; 1094.07,359.39 cw(c1109.48,359.39) v9@1108.25,374.75 ; 1094.07,363.72 cw(c1109.13,363.72) v9@1107.93,378.73 ; 1094.07,368.05 cw(c1108.79,368.05) v9@1107.61,382.72 ; 1094.07,372.39 cw(c1108.44,372.39) v9@1107.3,386.71 ; 1094.07,376.72 cw(c1108.09,376.72) v9@1106.98,390.7 ; v9@1104.81,395.41 ccw(c1100.24,415.59) 1120.93,415.59 ; v9@1105.7,391.51 ccw(c1101.37,410.58) 1120.93,410.58 ; v9@1106.58,387.61 ccw(c1102.51,405.57) 1120.93,405.57 ; v9@1107.4,374.72 cw(c1107.13,360.92) 1120.93,360.92 ; v9@1107.48,378.72 cw(c1107.21,365) 1120.93,365 ; v9@1107.46,383.71 ccw(c1103.64,400.57) 1120.93,400.57 ; v9@1107.56,382.72 cw(c1107.29,369.09) 1120.93,369.09 ; v9@1107.64,386.72 cw(c1107.37,373.17) 1120.93,373.17 ; v9@1107.73,390.72 cw(c1107.46,377.25) 1120.93,377.25 ; v9@1108.35,379.81 ccw(c1104.78,395.56) 1120.93,395.56 ; v9@1109.23,375.91 ccw(c1105.91,390.55) 1120.93,390.55 ; v1@1110.99,214.52 ccw(c1110.96,224.49) 1120.93,224.49 ; v1@1110.98,218.52 ccw(c1110.95,228.51) 1120.93,228.51 ; v1@1110.97,222.52 ccw(c1110.93,232.52) 1120.93,232.52 ; v1@1111.01,210.52 ccw(c1110.97,220.48) 1120.93,220.48 ; 1195.92,199.21 cw(c1207.92,199.21) v1@1206.5,211.12 ; 1195.92,203.71 cw(c1207.38,203.71) v1@1206.03,215.09 ; 1195.92,208.22 cw(c1206.85,208.22) v1@1205.56,219.07 ; 1195.92,358.84 cw(c1220.82,358.84) v1@1209.98,381.26 ; 1195.92,365.22 cw(c1217.74,365.22) v1@1208.24,384.86 ; 1195.92,371.59 cw(c1214.66,371.59) v1@1206.5,388.46 ; 1195.92,377.97 cw(c1211.58,377.97) v1@1204.76,392.06 ; 1195.92,399.67 ccw(c1208.67,399.67) v1@1205.16,387.41 ; 1195.92,404.98 ccw(c1210.2,404.98) v1@1206.26,391.25 ; 1195.92,410.28 ccw(c1211.72,410.28) v1@1207.37,395.1 ; v1@1208.47,398.94 cw(c1213.24,415.59) 1195.92,415.59 ; v1@1414.14,261.77 ccw(c1414.11,271.74) 1424.08,271.74 ; v1@1414.13,265.77 ccw(c1414.1,275.75) 1424.08,275.75 ; v1@1414.12,269.77 ccw(c1414.08,279.76) 1424.08,279.76 ; v1@1414.14,375.94 ccw(c1414.11,385.91) 1424.08,385.91 ; v1@1414.13,379.94 ccw(c1414.1,389.92) 1424.08,389.92 ; v1@1414.12,383.94 ccw(c1414.08,393.94) 1424.08,393.94 ; v1@1414.16,257.77 ccw(c1414.12,267.72) 1424.08,267.72 ; v1@1414.16,371.94 ccw(c1414.12,381.9) 1424.08,381.9 ; 1499.07,246.45 cw(c1511.07,246.45) v1@1509.65,258.37 ; 1499.07,250.96 cw(c1510.53,250.96) v1@1509.18,262.34 ; 1499.07,255.46 cw(c1510,255.46) v1@1508.7,266.31 ; 1499.07,359.39 cw(c1514.48,359.39) v9@1513.25,374.75 ; 1499.07,363.72 cw(c1514.13,363.72) v9@1512.93,378.73 ; 1499.07,368.05 cw(c1513.79,368.05) v9@1512.61,382.72 ; 1499.07,372.39 cw(c1513.44,372.39) v9@1512.3,386.71 ; 1499.07,376.72 cw(c1513.09,376.72) v9@1511.98,390.7 ; v9@1509.81,395.41 ccw(c1505.24,415.59) 1525.93,415.59 ; v9@1510.7,391.51 ccw(c1506.37,410.58) 1525.93,410.58 ; v9@1511.58,387.61 ccw(c1507.51,405.57) 1525.93,405.57 ; v9@1512.4,374.72 cw(c1512.13,360.92) 1525.93,360.92 ; v9@1512.48,378.72 cw(c1512.21,365) 1525.93,365 ; v9@1512.46,383.71 ccw(c1508.64,400.57) 1525.93,400.57 ; v9@1512.56,382.72 cw(c1512.29,369.09) 1525.93,369.09 ; v9@1512.64,386.72 cw(c1512.37,373.17) 1525.93,373.17 ; v9@1512.73,390.72 cw(c1512.46,377.25) 1525.93,377.25 ; v9@1513.35,379.81 ccw(c1509.78,395.56) 1525.93,395.56 ; v9@1514.23,375.91 ccw(c1510.91,390.55) 1525.93,390.55 ; 1581.84,3015.48 ccw(c1590,3000) 1607.5,3000 ccw(c1590,3000) 1603.89,3010.65 ; 1590.89,3132.97 1600.89,3132.97 cw(c1600.89,3121.97) 1611.64,3124.31 cw(c1622.39,3121.97) 1622.39,3132.97 1632.39,3132.97 cw(c1632.39,3121.97) 1643.13,3124.31 cw(c1653.88,3121.97) 1650.88,3132.55 1650.88,3189.4 ; 1600.92,358.84 cw(c1625.82,358.84) v1@1614.98,381.26 ; 1600.92,365.22 cw(c1622.74,365.22) v1@1613.24,384.86 ; 1600.92,371.59 cw(c1619.66,371.59) v1@1611.5,388.46 ; 1600.92,377.97 cw(c1616.58,377.97) v1@1609.76,392.06 ; 1600.92,399.67 ccw(c1613.67,399.67) v1@1610.16,387.41 ; 1600.92,404.98 ccw(c1615.2,404.98) v1@1611.26,391.25 ; 1600.92,410.28 ccw(c1616.72,410.28) v1@1612.37,395.1 ; 1603.89,3011.15 ccw(c1600.89,3021.73) 1611.64,3019.39 ccw(c1622.39,3021.73) 1619.39,3011.15 1619.39,2956.57 ccw(c1625,2940) 1642.5,2940 ccw(c1625,2940) 1635.39,2954.09 1635.39,3011.15 ccw(c1632.39,3021.73) 1643.13,3019.39 ccw(c1653.88,3021.73) 1653.88,3010.73 1663.88,3010.73 ccw(c1663.88,3021.73) 1674.63,3019.39 ccw(c1685.38,3021.73) 1685.38,3010.73 1695.38,3010.73 ; v1@1613.47,398.94 cw(c1618.24,415.59) 1600.92,415.59 ; 1698.38,3132.55 1698.38,3151.87 1709.84,3163.34 ccw(c1715.19,3180) 1732.69,3180 ccw(c1715.19,3180) 1698.53,3174.65 1684.72,3160.84 ; v1@1819.14,375.94 ccw(c1819.11,385.91) 1829.08,385.91 ; v1@1819.13,379.94 ccw(c1819.1,389.92) 1829.08,389.92 ; v1@1819.12,383.94 ccw(c1819.08,393.94) 1829.08,393.94 ; v1@1819.16,371.94 ccw(c1819.12,381.9) 1829.08,381.9 ; 1904.07,359.39 cw(c1919.48,359.39) v9@1918.25,374.75 ; 1904.07,363.72 cw(c1919.13,363.72) v9@1917.93,378.73 ; 1904.07,368.05 cw(c1918.79,368.05) v9@1917.61,382.72 ; 1904.07,372.39 cw(c1918.44,372.39) v9@1917.3,386.71 ; 1904.07,376.72 cw(c1918.09,376.72) v9@1916.98,390.7 ; v9@1914.81,395.41 ccw(c1910.24,415.59) 1930.93,415.59 ; v9@1915.7,391.51 ccw(c1911.37,410.58) 1930.93,410.58 ; v9@1916.58,387.61 ccw(c1912.51,405.57) 1930.93,405.57 ; v9@1917.4,374.72 cw(c1917.13,360.92) 1930.93,360.92 ; v9@1917.48,378.72 cw(c1917.21,365) 1930.93,365 ; v9@1917.46,383.71 ccw(c1913.64,400.57) 1930.93,400.57 ; v9@1917.56,382.72 cw(c1917.29,369.09) 1930.93,369.09 ; v9@1917.64,386.72 cw(c1917.37,373.17) 1930.93,373.17 ; v9@1917.73,390.72 cw(c1917.46,377.25) 1930.93,377.25 ; v9@1918.35,379.81 ccw(c1914.78,395.56) 1930.93,395.56 ; v9@1919.23,375.91 ccw(c1915.91,390.55) 1930.93,390.55 ; v1@1920.99,214.52 ccw(c1920.96,224.49) 1930.93,224.49 ; v1@1920.98,218.52 ccw(c1920.95,228.51) 1930.93,228.51 ; v1@1920.97,222.52 ccw(c1920.93,232.52) 1930.93,232.52 ; v1@1921.01,210.52 ccw(c1920.97,220.48) 1930.93,220.48 ; 2005.92,199.21 cw(c2017.92,199.21) v1@2016.5,211.12 ; 2005.92,203.71 cw(c2017.38,203.71) v1@2016.03,215.09 ; 2005.92,208.22 cw(c2016.85,208.22) v1@2015.56,219.07 ; 2005.92,358.84 cw(c2030.82,358.84) v1@2019.98,381.26 ; 2005.92,365.22 cw(c2027.74,365.22) v1@2018.24,384.86 ; 2005.92,371.59 cw(c2024.66,371.59) v1@2016.5,388.46 ; 2005.92,377.97 cw(c2021.58,377.97) v1@2014.76,392.06 ; 2005.92,399.67 ccw(c2018.67,399.67) v1@2015.16,387.41 ; 2005.92,404.98 ccw(c2020.2,404.98) v1@2016.26,391.25 ; 2005.92,410.28 ccw(c2021.72,410.28) v1@2017.37,395.1 ; v1@2018.47,398.94 cw(c2023.24,415.59) 2005.92,415.59 ; v1@2224.14,261.77 ccw(c2224.11,271.74) 2234.08,271.74 ; v1@2224.13,265.77 ccw(c2224.1,275.75) 2234.08,275.75 ; v1@2224.12,269.77 ccw(c2224.08,279.76) 2234.08,279.76 ; v1@2224.14,375.94 ccw(c2224.11,385.91) 2234.08,385.91 ; v1@2224.13,379.94 ccw(c2224.1,389.92) 2234.08,389.92 ; v1@2224.12,383.94 ccw(c2224.08,393.94) 2234.08,393.94 ; v1@2224.16,257.77 ccw(c2224.12,267.72) 2234.08,267.72 ; v1@2224.16,371.94 ccw(c2224.12,381.9) 2234.08,381.9 ; 2309.07,360.63 cw(c2321.07,360.63) v1@2319.65,372.54 ; 2309.07,365.13 cw(c2320.53,365.13) v1@2319.18,376.51 ; 2309.07,369.63 cw(c2320,369.63) v1@2318.7,380.48 ; -641,2325.62 ccw(c-633,2325.62) -638.66,2319.97 ; -641,2325.62 ccw(c-633,2325.62) -638.66,2319.97 ; -641,2325.62 -641,2349.69 -654.65,2363.34 cw(c-660,2380) -642.5,2380 cw(c-660,2380) -643.34,2374.65 -627.34,2358.66 ; -638.66,2319.97 -624.53,2305.84 ; -627.34,2358.66 cw(c-633,2353) -625,2353 ; -627.34,2358.66 cw(c-633,2353) -625,2353 ; -625,2353 -625,2328.94 -615.56,2319.5 -585,2319.5 ; -624.53,2305.84 ccw(c-618.88,2311.5) -618.88,2303.5 ; -624.53,2305.84 ccw(c-618.88,2311.5) -618.88,2303.5 ; -618.88,2303.5 -588.31,2303.5 -568,2283.19 -568,1773.31 -595.66,1745.66 ; -598,1520 ccw(c-590,1520) -595.66,1514.34 ; -598,1520 ccw(c-590,1520) -595.66,1514.34 ; -598,1520 -598,1740 ; -598,1740 cw(c-590,1740) -595.66,1745.66 ; -598,1740 cw(c-590,1740) -595.66,1745.66 ; -595.66,1514.34 -540.36,1459.05 ; -585,2319.5 cw(c-585,2311.5) -579.34,2317.16 ; -585,2319.5 cw(c-585,2311.5) -579.34,2317.16 ; -584.81,3667 ccw(c-584.81,3675) -579.15,3669.34 ; -584.81,3667 ccw(c-584.81,3675) -579.15,3669.34 ; -579.34,2317.16 -554.34,2292.16 ; -579.15,3669.34 -558.73,3689.77 ; -558.72,3689.77 -504.34,3744.15 ; -554.34,1764.34 ccw(c-560,1770) -552,1770 ; -554.34,1764.34 ccw(c-560,1770) -552,1770 ; -554.34,1764.34 -582,1736.69 -582,1523.31 -531.39,1472.71 -426.23,1472.71 -398.28,1500.66 ; -554.34,2292.16 cw(c-560,2286.5) -552,2286.5 ; -554.34,2292.16 cw(c-560,2286.5) -552,2286.5 ; -552,1770 -552,2286.5 ; -540.36,1459.05 ccw(c-534.71,1464.71) -534.71,1456.71 ; -540.36,1459.05 ccw(c-534.71,1464.71) -534.71,1456.71 ; -534.71,1456.71 -422.92,1456.71 ; -523,4110.19 ccw(c-515,4110.19) -520.66,4104.53 ; -523,4110.19 ccw(c-515,4110.19) -520.66,4104.53 ; -523,4110.19 -523,4149.44 cw(c-515,4165) -497.5,4165 cw(c-515,4165) -507,4149.44 -507,4113.5 -504.15,4110.66 ; -504.34,3744.15 ccw(c-510,3749.81) -502,3749.81 ; -504.34,3744.15 ccw(c-510,3749.81) -502,3749.81 ; -504.15,4110.66 cw(c-509.81,4105) -501.81,4105 ; -504.15,4110.66 cw(c-509.81,4105) -501.81,4105 ; -439.34,4684.19 ccw(c-445,4689.85) -437,4689.85 ; -439.34,4684.19 ccw(c-445,4689.85) -437,4689.85 ; -439.34,4684.19 -493.15,4630.39 cw(c-509.81,4625.04) -492.31,4625.04 cw(c-509.81,4625.04) -504.46,4641.7 -453,4693.16 -453,4779.44 cw(c-445,4795) -427.5,4795 cw(c-445,4795) -437,4779.44 -437,4689.85 ; -422.92,1456.71 ccw(c-422.92,1464.71) -417.26,1459.05 ; -422.92,1456.71 ccw(c-422.92,1464.71) -417.26,1459.05 ; -417.26,1459.05 -389.31,1487 -88.31,1487 277,1121.69 277,905.56 ccw(c285,890) 302.5,890 ccw(c285,890) 293,905.56 293,1125 ; -398.28,1500.66 cw(c-392.62,1495) -392.62,1503 ; -398.28,1500.66 cw(c-392.62,1495) -392.62,1503 ; -392.62,1503 -85,1503 ; -335,4958 cw(c-335,4950) -329.34,4955.66 ; -335,4958 cw(c-335,4950) -329.34,4955.66 ; -314.44,5008 cw(c-314.44,5000) -308.78,5005.66 ; -314.43,5008 cw(c-314.43,5000) -308.78,5005.66 ; -314.44,5008 -338.04,5008 ccw(c-349.76,5005.91) -349.76,5017.81 -428.5,5017.81 ccw(c-428.5,5005.91) -440.41,5005.91 -440.41,4994.09 ccw(c-428.5,4994.09) -428.5,4982.19 -349.76,4982.19 ccw(c-349.76,4994.09) -338.04,4992 -317.75,4992 -300.09,4974.34 ; -308.78,5005.66 -291.12,4988 -280.56,4988 cw(c-265,4980) -247.5,4980 cw(c-265,4980) -280.56,4972 -294.44,4972 ; -300.09,4974.34 ccw(c-294.44,4980) -294.44,4972 ; -300.09,4974.34 ccw(c-294.44,4980) -294.44,4972 ; -233.09,3194.34 ccw(c-227.44,3200) -227.44,3192 ; -233.09,3194.34 ccw(c-227.44,3200) -227.44,3192 ; -233.09,3194.34 -287.79,3249.05 cw(c-293.14,3265.71) -275.64,3265.71 cw(c-293.14,3265.71) -276.48,3260.36 -224.12,3208 -40,3208 ; -227.44,3192 -43.31,3192 152.86,2995.83 152.86,2907.27 ccw(c160.86,2891.71) 178.36,2891.71 ccw(c160.86,2891.71) 168.86,2907.27 168.86,2999.14 ; -167.81,3305 ccw(c-159.81,3305) -165.47,3299.34 ; -167.81,3305 ccw(c-159.81,3305) -165.47,3299.34 ; -167.81,3305 -167.81,3544.3 cw(c-159.81,3559.86) -142.31,3559.86 cw(c-159.81,3559.86) -151.81,3544.3 -151.81,3308.31 -118.2,3274.71 83.29,3274.71 ; -165.47,3299.34 -127.17,3261.05 ; -127.17,3261.05 ccw(c-121.52,3266.71) -121.52,3258.71 ; -127.17,3261.05 ccw(c-121.52,3266.71) -121.52,3258.71 ; -121.52,3258.71 79.98,3258.71 273.86,3064.83 273.86,1815.23 219.34,1760.72 ; -85,1503 cw(c-85,1495) -79.34,1500.66 ; -85,1503 cw(c-85,1495) -79.34,1500.66 ; -79.34,1500.66 290.66,1130.66 ; -40,3208 cw(c-40,3200) -34.34,3205.66 ; -40,3208 cw(c-40,3200) -34.34,3205.66 ; -34.34,3205.66 166.51,3004.8 ; 83.29,3274.71 cw(c83.29,3266.71) 88.95,3272.36 ; 83.29,3274.71 cw(c83.29,3266.71) 88.95,3272.36 ; 88.95,3272.36 287.51,3073.8 ; 117,4284.85 cw(c125,4284.85) 119.34,4290.51 ; 117,4284.85 cw(c125,4284.85) 119.34,4290.51 ; 117,4284.85 117,3560.43 95.28,3538.71 ccw(c76.12,3508.23) 112.12,3508.23 ccw(c76.12,3508.23) 106.6,3527.4 130.66,3551.46 ; 119.34,4290.51 288.85,4460.02 288.85,4576.85 ; 130.66,3551.46 ccw(c125,3557.11) 133,3557.11 ; 130.66,3551.46 ccw(c125,3557.11) 133,3557.11 ; 133,3557.11 133,4281.54 302.51,4451.05 ; 166.51,3004.8 cw(c160.86,2999.14) 168.86,2999.14 ; 166.51,3004.8 cw(c160.86,2999.14) 168.86,2999.14 ; 217,1410 ccw(c225,1410) 219.34,1404.34 ; 217,1410 ccw(c225,1410) 219.34,1404.34 ; 217,1410 217,1755.06 ; 217,1755.06 cw(c225,1755.06) 219.34,1760.72 ; 217,1755.06 cw(c225,1755.06) 219.34,1760.72 ; 219.34,1404.34 338.34,1285.35 ccw(c355,1280) 372.5,1280 ccw(c355,1280) 349.65,1296.66 233,1413.31 233,1751.75 287.51,1806.26 ; 287.51,1806.26 ccw(c281.86,1811.92) 289.86,1811.92 ; 287.51,1806.26 ccw(c281.86,1811.92) 289.86,1811.92 ; 287.51,3073.8 cw(c281.86,3068.14) 289.86,3068.14 ; 287.51,3073.8 cw(c281.86,3068.14) 289.86,3068.14 ; 288.85,4576.85 cw(c296.85,4576.85) 291.2,4582.51 ; 288.85,4576.85 cw(c296.85,4576.85) 291.2,4582.51 ; 289.86,1811.92 289.86,3068.14 ; 290.66,1130.66 cw(c285,1125) 293,1125 ; 290.66,1130.66 cw(c285,1125) 293,1125 ; 291.2,4582.51 303.34,4594.65 cw(c320,4600) 337.5,4600 cw(c320,4600) 314.65,4583.34 304.85,4573.54 304.85,4456.7 ; 302.51,4451.05 ccw(c296.85,4456.7) 304.85,4456.7 ; 302.51,4451.05 ccw(c296.85,4456.7) 304.85,4456.7 ; 402,2810 ccw(c410,2810) 404.34,2804.34 ; 402,2810 ccw(c410,2810) 404.34,2804.34 ; 402,2810 402,3129.52 ; 402,3129.52 cw(c410,3129.52) 404.34,3135.17 ; 402,3129.52 cw(c410,3129.52) 404.34,3135.17 ; 404.34,2804.34 622,2586.69 622,1170 622,955.57 ; 404.34,3135.17 513.46,3244.29 cw(c530,3250) 547.5,3250 cw(c530,3250) 525.02,3233.22 418,3126.2 418,2813.31 635.66,2595.66 ; 622,955.57 ccw(c630,955.57) 624.34,949.91 ; 622,955.57 ccw(c630,955.57) 624.34,949.91 ; 624.34,949.91 1049.34,524.91 ; 635.66,2595.66 cw(c630,2590) 638,2590 ; 635.66,2595.66 cw(c630,2590) 638,2590 ; 638,2590 638,1173.31 638,958.88 1058.31,538.57 1780,538.57 ; 790.92,415.59 ccw(c753.43,415.59) 715.93,415.59 715.93,360.47 ccw(c753.43,360.47) 790.92,360.47 790.92,415.59 ; 1019.08,393.94 cw(c1056.57,393.94) 1094.07,393.94 1094.07,358.5 cw(c1056.57,358.5) 1019.08,358.5 1019.08,393.94 ; 1049.34,524.91 ccw(c1055,530.57) 1055,522.57 ; 1049.34,524.91 ccw(c1055,530.57) 1055,522.57 ; 1055,522.57 1776.69,522.57 1858.57,440.68 1858.57,430.57 ccw(c1866.57,393.94) 1829.08,393.94 ; 1120.93,232.52 cw(c1158.43,232.52) 1195.92,232.52 1195.92,197.09 cw(c1158.43,197.09) 1120.93,197.09 1120.93,232.52 ; 1120.93,415.59 cw(c1158.43,415.59) 1195.92,415.59 ; 1120.93,415.59 1120.93,360.47 ccw(c1158.43,360.47) 1195.92,360.47 1195.92,415.59 ; 1424.08,279.76 cw(c1461.57,279.76) 1499.07,279.76 1499.07,244.33 cw(c1461.57,244.33) 1424.08,244.33 1424.08,279.76 ; 1424.08,393.94 cw(c1461.57,393.94) 1499.07,393.94 1499.07,358.5 cw(c1461.57,358.5) 1424.08,358.5 1424.08,393.94 ; 1525.93,415.59 cw(c1563.43,415.59) 1600.92,415.59 ; 1525.93,415.59 1525.93,360.47 ccw(c1563.43,360.47) 1600.92,360.47 1600.92,415.59 ; 1650.88,3189.4 cw(c1658.88,3189.4) 1652,3193.48 ; 1650.88,3189.4 cw(c1658.88,3189.4) 1652,3193.48 ; 1652,3193.48 1652,3254.44 cw(c1660,3270) 1677.5,3270 cw(c1660,3270) 1668,3254.44 1668,3190.52 ; 1666.88,3186.44 ccw(c1660,3190.52) 1668,3190.52 ; 1666.88,3186.44 ccw(c1660,3190.52) 1668,3190.52 ; 1666.88,3186.44 1666.88,3132.55 cw(c1663.88,3121.97) 1674.63,3124.31 cw(c1685.38,3121.97) 1682.38,3132.55 1682.38,3155.19 ; 1682.38,3155.19 cw(c1690.38,3155.19) 1684.72,3160.84 ; 1682.38,3155.19 cw(c1690.38,3155.19) 1684.72,3160.84 ; 1780,538.57 cw(c1780,530.57) 1785.66,536.23 ; 1780,538.57 cw(c1780,530.57) 1785.66,536.23 ; 1785.66,536.23 1872.23,449.65 ; 1829.08,393.94 1829.08,358.5 ccw(c1866.57,358.5) 1904.07,358.5 1904.07,393.94 ccw(c1866.57,393.94) 1874.57,430.57 1874.57,443.99 ; 1872.23,449.65 cw(c1866.57,443.99) 1874.57,443.99 ; 1872.23,449.65 cw(c1866.57,443.99) 1874.57,443.99 ; 1930.93,232.52 cw(c1968.43,232.52) 2005.92,232.52 2005.92,197.09 cw(c1968.43,197.09) 1930.93,197.09 1930.93,232.52 ; 1930.93,415.59 cw(c1968.43,415.59) 2005.92,415.59 ; 1930.93,415.59 1930.93,360.47 ccw(c1968.43,360.47) 2005.92,360.47 2005.92,415.59 ; 2234.08,279.76 cw(c2271.57,279.76) 2309.07,279.76 2309.07,244.33 cw(c2271.57,244.33) 2234.08,244.33 2234.08,279.76 ; 2234.08,393.94 cw(c2271.57,393.94) 2309.07,393.94 2309.07,358.5 cw(c2271.57,358.5) 2234.08,358.5 2234.08,393.94 ; -577.5,2345 ccw(c-595,2345) -577.5,2345 ; -362.5,3940 ccw(c-380,3940) -362.5,3940 ; -350.64,4308.37 ccw(c-368.14,4308.37) -350.64,4308.37 ; -337.5,4020 ccw(c-355,4020) -337.5,4020 ; -247.5,5050 ccw(c-265,5050) -247.5,5050 ; -237.5,3670 ccw(c-255,3670) -237.5,3670 ; -232.5,3760 ccw(c-250,3760) -232.5,3760 ; -217.5,4925 ccw(c-235,4925) -217.5,4925 ; -162.5,4460 ccw(c-180,4460) -162.5,4460 ; -139,4095 ccw(c-156.5,4095) -139,4095 ; -108.98,5216.71 ccw(c-126.48,5216.71) -108.98,5216.71 ; -108.64,5267.04 ccw(c-126.14,5267.04) -108.64,5267.04 ; -107.5,5105 ccw(c-125,5105) -107.5,5105 ; -97.5,4135 ccw(c-115,4135) -97.5,4135 ; -56.98,2139.71 ccw(c-74.48,2139.71) -56.98,2139.71 ; -32.5,3920 ccw(c-50,3920) -32.5,3920 ; -17.5,3790 ccw(c-35,3790) -17.5,3790 ; v1@-0.64,2901.71 ccw(c-18.14,2901.71) v1@-0.64,2901.71 ; 7.69,2658.37 ccw(c-9.81,2658.37) 7.69,2658.37 ; 37.69,2368.71 ccw(c20.19,2368.71) 37.69,2368.71 ; 57.69,858.37 ccw(c40.19,858.37) 57.69,858.37 ; 91.02,5025.04 ccw(c73.52,5025.04) 91.02,5025.04 ; 112.12,3408.23 ccw(c76.12,3408.23) 112.12,3408.23 ; v1@178.36,2800.04 ccw(c160.86,2800.04) v1@178.36,2800.04 ; 199.36,4950.04 ccw(c181.86,4950.04) 199.36,4950.04 ; 247.5,1285 ccw(c230,1285) 247.5,1285 ; 257.5,5015 ccw(c240,5015) 257.5,5015 ; 347.5,4675 ccw(c330,4675) 347.5,4675 ; 707.69,2725.04 ccw(c690.19,2725.04) 707.69,2725.04 ; 782.5,2575 ccw(c765,2575) 782.5,2575 ; 797.5,4555 ccw(c780,4555) 797.5,4555 ; 1099.36,991.71 ccw(c1081.86,991.71) 1099.36,991.71 ; 1167.36,4635.71 ccw(c1149.86,4635.71) 1167.36,4635.71 ; 1292.5,860 ccw(c1275,860) 1292.5,860 ; 1374.36,991.71 ccw(c1356.86,991.71) 1374.36,991.71
  Top Layer w12: U26.8@-389.13,4850 -200,4850 v1(-175,4875) ; U26.1@-389.13,5200 -306.18,5200 -281.14,5225.04 v1(-243.14,5225.04) ; U26.8@-351.56,4845.89 cw(c-341.64,4835.97) -341.64,4850 cw(c-341.64,4864.03) U26.8@-351.56,4854.11 ; U26.1@-351.56,5195.89 cw(c-341.64,5185.97) -341.64,5200 cw(c-341.64,5214.03) U26.1@-351.56,5204.11 ; v1@-247.03,5221.15 ccw(c-256.42,5211.76) -256.42,5225.04 ccw(c-256.42,5238.32) v1@-247.03,5228.93 ; v1@-180.5,4875 cw(c-193.78,4875) -184.39,4865.61 cw(c-175,4856.22) v1@-175,4869.5 ; v1@-130.36,2712.26 ccw(c-139.75,2721.65) -126.48,2721.65 ccw(c-113.2,2721.65) v1@-122.59,2712.26 ; v1(-126.48,2708.37) -126.48,2728.52 -120,2735 -80.63,2735 U1.20@-79.84,2734.21 ; v1@109.69,5625.04 cw(c96.41,5625.04) 105.8,5615.65 cw(c115.19,5606.26) v1@115.19,5619.54 ; v1(115.19,5625.04) 85,5594.85 85,5110 210,4985 496.9,4985 575,4906.9 575,4680 155,4260 155,3480 190,3445 190,3385 331.86,3243.14 331.86,3128.14 v1(331.86,2766.71) ; v1@327.97,2770.6 ccw(c318.58,2779.99) 331.86,2779.99 ccw(c345.14,2779.99) v1@335.75,2770.6 ; v1(720.52,2634.71) 800.29,2634.71 815,2620 900,2535 900,850 1110,640 v1(1110,575) ; v1@724.41,2630.82 cw(c733.8,2621.43) 733.8,2634.71 cw(c733.8,2647.99) v1@724.41,2638.6 ; v1@1106.11,578.89 ccw(c1096.72,588.28) 1110,588.28 ccw(c1123.28,588.28) v1@1113.89,578.89 ; v1@1106.11,591.11 cw(c1096.72,581.72) 1110,581.72 cw(c1123.28,581.72) v1@1113.89,591.11 ; v1@1106.11,598.89 ccw(c1096.72,608.28) 1110,608.28 ccw(c1123.28,608.28) v1@1113.89,598.89 ; v1@1106.11,611.11 cw(c1096.72,601.72) 1110,601.72 cw(c1123.28,601.72) v1@1113.89,611.11 ; v1@1106.11,618.89 ccw(c1096.72,628.28) 1110,628.28 ccw(c1123.28,628.28) v1@1113.89,618.89